# Altium PCB PCB1.PcbDoc
Units mm, origin at the board's own origin, x right, y up, seen from the top; angles counter-clockwise.
Board outline 191.39 x 165.1 mm, 2 copper layers (Top Layer, Bottom Layer); 71 components, 120 nets, 363 pads, 4 vias.
Unrouted connection lines stored in the file: 4.
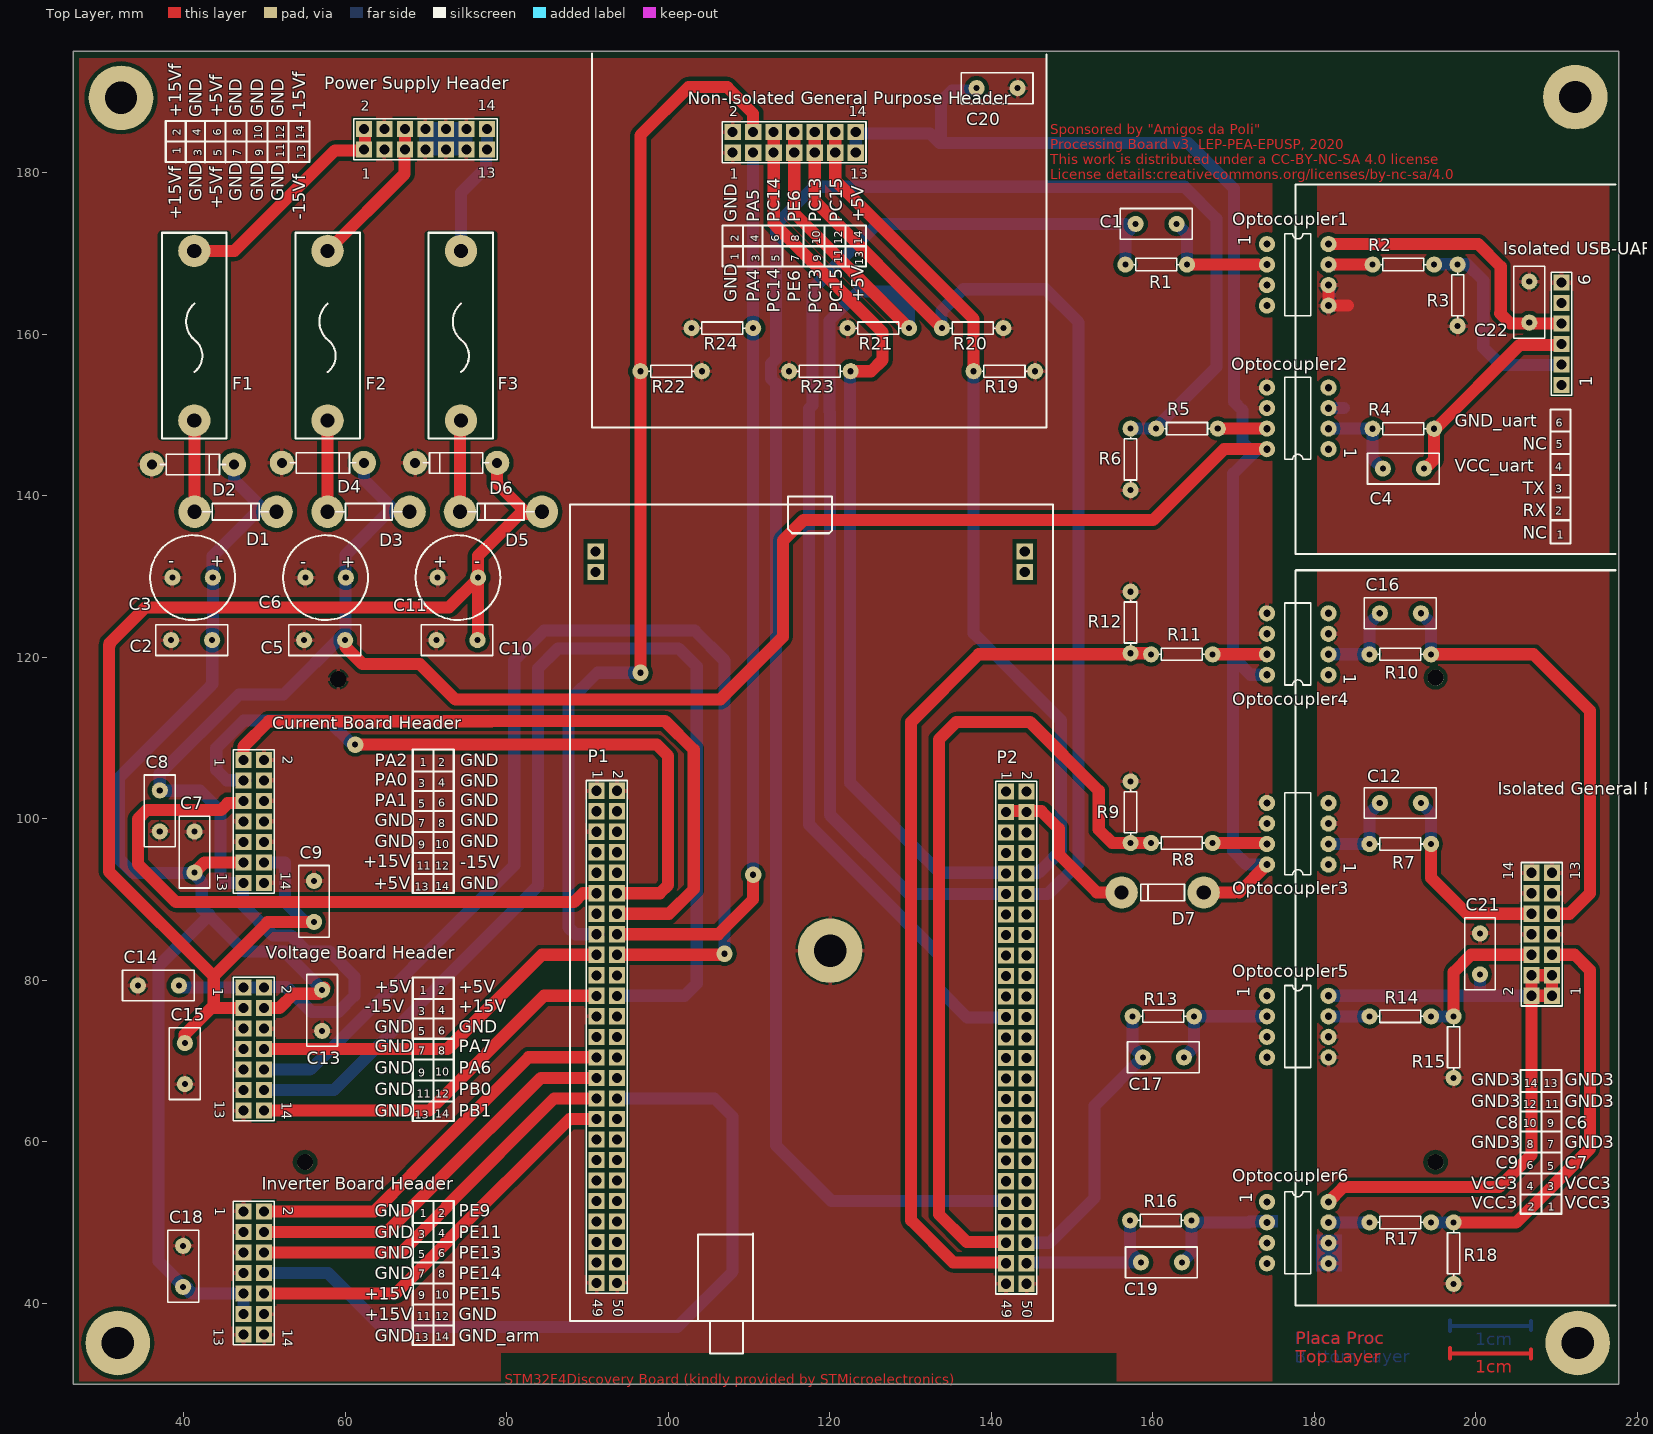
[diagram p0: Top Layer view]
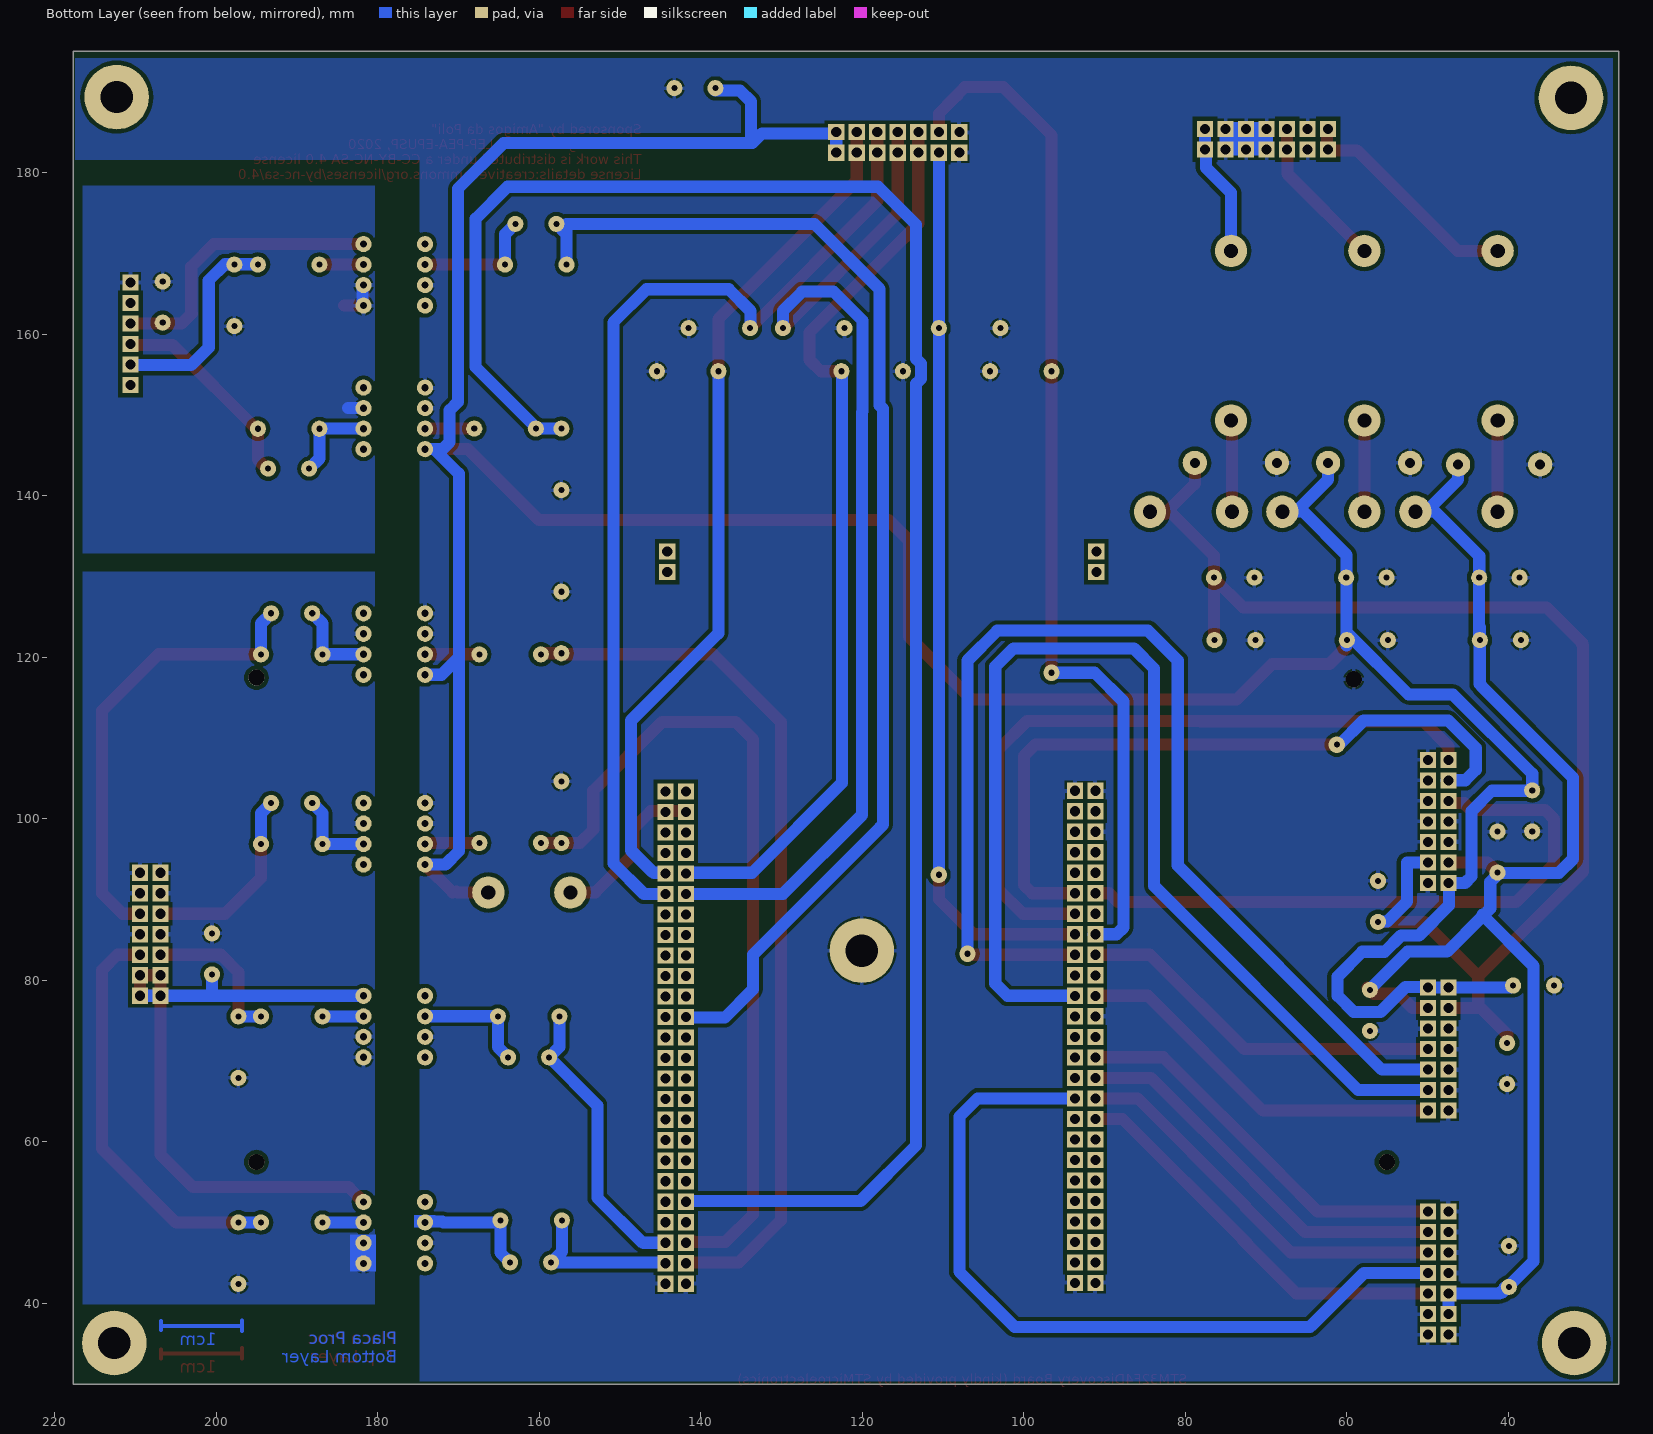
[diagram p1: Bottom Layer view, seen from below]

## Layer stack, top to bottom
Top Solder: solder mask 0.0102, Solder Resist, Dk 3.5
Top Layer: signal copper 0.0356
Dielectric 1: dielectric 0.32, FR-4, Dk 4.8
Bottom Layer: signal copper 0.0356
Bottom Solder: solder mask 0.0102, Solder Resist, Dk 3.5

## Board outline
26.289,195.072 26.289,29.972 217.678,29.972 217.678,195.072

## Design rules (kind name [scope] priority, off if disabled: settings)
Clearance Clearance_1 [All] p1: gap=0.5
PlaneConnect [All] p1: planeconnectstyle=Direct reliefexpansion=0.508 reliefentries=4 reliefconductorwidth=0.254 reliefairgap=0.508
PolygonConnect [All] p1: connectstyle=Relief reliefconductorwidth=0.5 reliefentries=4 polygonreliefangle="90 Angle" airgapwidth=0.254
RoomDefinition "S bus (5.775 X 3.30 inches)" [InComponentClass('S bus (5.775 X 3.30 inches)')] p1: confinementstyle=ConfineOut formatcopy=TRUE lockcomponents=FALSE outline 358.775,194.945 298.45,194.945 298.45,25.4 358.775,25.4
RoutingVias [All] p1: holewidth=0.711 width=1.27 viastyle="Through Hole" minholewidth=0.711 minwidth=1.27 maxholewidth=0.711 maxwidth=1.27
SolderMaskExpansion [All] p1: expansion=0.102
Width [All] p1: maxlimit=1.5 minlimit=1 preferedwidth=1.5 minimp=50.000000 maximp=50.000000 favimp=50.000000 checkconnectedcopper=TRUE
29 further rules are at their usual default settings.

## Components (designator, comment, footprint, x,y, rotation, side; value= is the part's Value field where it differs from the comment)
C1 "Ceramic 50 V" RAD-0.2 160.4,173.7 r180 top
C2 "Ceramic 50 V" RAD-0.2 40.953,122.143 r0 top
C3 "Electrolytic 50 V" RB5-10.5 41.063,129.89 r0 top
C4 "Ceramic 50 V" RAD-0.2 191.008,143.383 r0 top
C5 "Ceramic 50 V" RAD-0.2 57.425,122.143 r0 top
C6 "Electrolytic 50 V" RB5-10.5 57.535,129.89 r0 top
C7 "Ceramic 50 V" RAD-0.2 41.3,95.9 r270 top
C8 "Ceramic 50 V" RAD-0.2 37,101 r90 top
C9 "Ceramic 50 V" RAD-0.2 56.1,89.8 r270 top
C10 "Ceramic 50 V" RAD-0.2 73.808,122.143 r0 top
C11 "Electrolytic 50 V" RB5-10.5 73.918,129.89 r0 top
C12 "Ceramic 50 V" RAD-0.2 190.627,101.981 r0 top
C13 "Ceramic 50 V" RAD-0.2 57.1,76.3 r90 top
C14 "Ceramic 50 V" RAD-0.2 36.83,79.375 r0 top
C15 "Ceramic 50 V" RAD-0.2 40.1,69.7 r90 top
C16 "Ceramic 50 V" RAD-0.2 190.627,125.476 r0 top
C17 "Ceramic 50 V" RAD-0.2 161.29,70.485 r180 top
C18 "Ceramic 50 V" RAD-0.2 39.9,44.6 r90 top
C19 "Ceramic 50 V" RAD-0.2 161.036,45.085 r180 top
C20 "Ceramic 50 V" RAD-0.2 140.7,190.5 r0 top
C21 "Ceramic 50 V" RAD-0.2 200.5,83.3 r270 top
C22 "Ceramic 50 V" RAD-0.2 206.6,164 r270 top
"Current Board Header" "Header 7X2" HDR2X7 47.371,107.315 r270 top (schematic designator "CURRENT TRANS.")
D1 "1N5822" AXIAL-0.4 46.393,138.048 r0 top
D2 "1N4745A" DIODE-0.4 41.1,143.9 r0 top
D3 "1N5822" AXIAL-0.4 62.865,138.048 r0 top
D4 "1N4735A" DIODE-0.4 57.2,144.1 r0 top
D5 "1N5822" AXIAL-0.4 79.248,138.048 r180 top
D6 "1N4745A" DIODE-0.4 73.7,144.1 r180 top
D7 "1N5822" AXIAL-0.4 161.2,90.9 r180 top
F1 "1.0 A" Fusivel 41.275,147.352 r90 top
F2 "2.0 A" Fusivel 57.785,147.352 r90 top
F3 "1.0 A" Fusivel 74.295,147.352 r90 top
"Inverter Board Header" "Header 7X2" HDR2X7 47.371,51.392 r270 top (schematic designator INVERTER)
"Isolated General Purpose Header" "Header 7X2" HDR2X7 209.423,78.105 r90 top (schematic designator ISOLATED)
"Isolated USB-UART Header" "Header 6H" HDR1X6 210.593,153.736 r90 top (schematic designator UART)
"Non-Isolated General Purpose Header" "Header 7X2" HDR2X7 107.95,182.515 r0 top (schematic designator "NOT ISOLATED")
Optocoupler1 "A2200" DIP8 174.117,171.196 r0 top
Optocoupler2 "A2200" DIP8 181.737,145.796 r180 top
Optocoupler3 "A2200" DIP8 181.737,94.361 r180 top
Optocoupler4 "A2200" DIP8 181.737,117.856 r180 top
Optocoupler5 "A2200" DIP8 174.117,78.105 r0 top
Optocoupler6 "A2200" DIP8 174.117,52.578 r0 top
P1 "Header 25X2" HDR2X25 91.1,103.5 r270 top
P2 "Header 25X2" HDR2X25 141.8,103.4 r270 top
"Power Supply Header" "Header 7X2" HDR2X7 62.275,182.915 r0 top (schematic designator "POWER SUPPLY")
R1 "1/4W*" AXIAL-0.3 160.401,168.656 r0 top
R2 "1/4W*" AXIAL-0.3 191.008,168.656 r0 top
R3 "1/4W*" AXIAL-0.3 197.739,164.846 r90 top
R4 "1/4W*" AXIAL-0.3 191.008,148.326 r180 top
R5 "1/4W*" AXIAL-0.3 164.211,148.336 r180 top
R6 "1/4W*" AXIAL-0.3 157.226,144.526 r90 top
R7 "1/4W*" AXIAL-0.3 190.627,96.901 r180 top
R8 "1/4W*" AXIAL-0.3 163.576,97.028 r180 top
R9 "1/4W*" AXIAL-0.3 157.226,100.838 r270 top
R10 "1/4W*" AXIAL-0.3 190.627,120.396 r180 top
R11 "1/4W*" AXIAL-0.3 163.576,120.396 r180 top
R12 "1/4W*" AXIAL-0.3 157.226,124.333 r270 top
R13 "1/4W*" AXIAL-0.3 161.29,75.565 r0 top
R14 "1/4W*" AXIAL-0.3 190.627,75.555 r0 top
R15 "1/4W*" AXIAL-0.3 197.231,71.745 r90 top
R16 "1/4W*" AXIAL-0.3 160.976,50.292 r0 top
R17 "1/4W*" AXIAL-0.3 190.627,50.038 r0 top
R18 "1/4W*" AXIAL-0.3 197.231,46.228 r90 top
R19 "1/4W*" AXIAL-0.3 141.605,155.448 r0 top
R20 "1/4W*" AXIAL-0.3 137.668,160.782 r0 top
R21 "1/4W*" AXIAL-0.3 125.984,160.782 r180 top
R22 "1/4W*" AXIAL-0.3 100.33,155.448 r0 top
R23 "1/4W*" AXIAL-0.3 118.745,155.448 r180 top
R24 "1/4W*" AXIAL-0.3 106.68,160.782 r180 top
"Voltage Board Header" "Header 7X2" HDR2X7 47.371,79.121 r270 top (schematic designator "VOLTAGE TRANS.")

## Footprints (in the part's own frame and the unit in brackets; to place one, negate y for a bottom-side part, rotate by r counter-clockwise, add the part's x,y. Pads: shape width x height; smd on the part's side, far side on the other; paste and mask are expansions set on the pad)
AXIAL-0.3 [mm] "Axial Device, Thru-Hole; 2 Leads; 0.3 in Pin Spacing"
  round 2 hole 0.75: 1(-3.81,0) 2(3.81,0)
  silkscreen extent -2.77,-0.76 2.77,0.76
AXIAL-0.4 [mm] "Axial Device, Thru-Hole; 2 Leads; 0.4 in Pin Spacing"
  round 4 hole 1.75: 1(-5.08,0) 2(5.08,0)
  silkscreen extent -4.06,-1.02 4.06,1.02
DIODE-0.4 [mm] "Diode, Thru-Hole; 2 Leads; 0.4 in Pin Spacing"
  round 3 hole 1.25: 1(-5.08,0) 2(5.08,0)
  silkscreen extent -4.06,-1.27 4.06,1.27
DIP8 [mm]
  round 2 hole 0.9: 1(0,0) 2(0,-2.54) 3(0,-5.08) 4(0,-7.62) 5(7.62,0) 6(7.62,-2.54) 7(7.62,-5.08) 8(7.62,-7.62)
  silkscreen extent 2.21,-8.89 5.41,1.27
Fusivel [mm]
  round 4 hole 1.75 unplated: 1(2,0) 2(23,0)
  silkscreen extent -0.25,-4 25.25,4, body extent 0,-4 25,4, height 20
HDR1X6 [mm]
  rect 2x2 hole 1.25: 1(0,0) 2(2.54,0) 3(5.08,0) 4(7.62,0) 5(10.16,0) 6(12.7,0)
  silkscreen extent -1.27,-1.27 13.97,1.27, body extent -1.02,-1.02 13.72,1.02, height 5.08
HDR2X7 [mm] "Connector; Header; 7x2 Position"
  rect 2x2 hole 1.25: 1(0,0) 2(0,2.54) 3(2.54,0) 4(2.54,2.54) 5(5.08,0) 6(5.08,2.54) 7(7.62,0) 8(7.62,2.54) 9(10.16,0) 10(10.16,2.54) 11(12.7,0) 12(12.7,2.54) 13(15.24,0) 14(15.24,2.54)
  silkscreen extent -1.27,-1.27 16.51,3.81
HDR2X25 [mm] "Connector; Header; 25x2 Position"
  rect 2x2 hole 1.25: 1(0,0) 2(0,2.54) 3(2.54,0) 4(2.54,2.54) 5(5.08,0) 6(5.08,2.54) 7(7.62,0) 8(7.62,2.54) 9(10.16,0) 10(10.16,2.54) 11(12.7,0) 12(12.7,2.54) 13(15.24,0) 14(15.24,2.54) 15(17.78,0) 16(17.78,2.54) 17(20.32,0) 18(20.32,2.54) 19(22.86,0) 20(22.86,2.54) 21(25.4,0) 22(25.4,2.54) 23(27.94,0) 24(27.94,2.54) 25(30.48,0) 26(30.48,2.54) 27(33.02,0) 28(33.02,2.54) 29(35.56,0) 30(35.56,2.54) 31(38.1,0) 32(38.1,2.54) 33(40.64,0) 34(40.64,2.54) 35(43.18,0) 36(43.18,2.54) 37(45.72,0) 38(45.72,2.54) 39(48.26,0) 40(48.26,2.54) 41(50.8,0) 42(50.8,2.54) 43(53.34,0) 44(53.34,2.54) 45(55.88,0) 46(55.88,2.54) 47(58.42,0) 48(58.42,2.54) 49(60.96,0) 50(60.96,2.54)
  silkscreen extent -1.27,-1.27 62.23,3.81
RAD-0.2 [mm] "Radial Cap, Thru-Hole; 2 Leads; 0.2 in Pin Spacing"
  round 2 hole 0.75 unplated: 1(-2.54,0) 2(2.54,0)
  silkscreen extent -4.44,-1.91 4.44,1.91
RB5-10.5 [mm] "Capacitor (Radial); 2 Leads"
  round 2 hole 0.75: 1(-2.5,0) 2(2.5,0)
  silkscreen extent -5.25,-5.25 5.25,5.25

## Part data
C1 C2 C3 C4 C5 C6 C7 C8 C9 C10 C11 C12 C13 C14 C15 C16 C17 C18 C19 C20 C21 C22: library part Cap, "Capacitor"
"Current Board Header" "Inverter Board Header" "Isolated General Purpose Header" "Non-Isolated General Purpose Header" "Power Supply Header" "Voltage Board Header": "Header, 7-Pin, Dual row"
D1 D3 D5 D7: library part Diode, "Default Diode"
D2 D4 D6: library part "D Zener", "Zener Diode"
F1 F2 F3: library part "Fuse 2", "Fuse"
"Isolated USB-UART Header": "Header, 6-Pin, Right Angle"
Optocoupler1 Optocoupler2 Optocoupler3 Optocoupler4 Optocoupler5 Optocoupler6: library part Optoacoplador
P1 P2: "Header, 25-Pin, Dual row"
R1 R2 R3 R4 R5 R6 R7 R8 R9 R10 R11 R12 R13 R14 R15 R16 R17 R18 R19 R20 R21 R22 R23 R24: library part Res1, "Resistor"

## Free pads (board coordinates)
  round 8 hole 4: 10(31.8,35.1) 10(32.2,189.3) 10(120.015,83.693) 10(212.3,189.4) 10(212.6,35.1)
  rect 2x2 hole 1.25: 11(90.983,130.583) 11(90.983,133.123) 11(144.121,130.583) 11(144.121,133.123)
  round 2 hole 2 paste+2: 12(59.1,117.3) 13(55,57.5) 14(195,57.5) 15(195,117.5)

## Via types
v1: diameter 2, hole 0.75, Top Layer to Bottom Layer, 4 vias

## Nets (pads, with @x,y where several pads share a name; then routed paths per layer and width w, separated by ;. In a path a pad name is that pad's centre, name@x,y a point inside that pad or via, vN(x,y) a via of type N, cw(c..) or ccw(c..) an arc to the next point about the centre after c; other vN are vias at no path point)
"+3 V ARM": P2.6
"+ 3 V ARM": P2.5
"+ 5 V": "Current Board Header.13" "Non-Isolated General Purpose Header.13" "Non-Isolated General Purpose Header.14" "Voltage Board Header.1" "Voltage Board Header.2" C5.2 C6.2 C8.2 C14.2 C20.1 D3.2 D4.2 D7.1 Optocoupler2.5 Optocoupler3.5 Optocoupler4.5 | length 432.7
  Top Layer w1.5: C5.2@60,122.2 60,121.3 62.1,119.2 69.2,119.2 ; 69.204,119.204 73.6,114.808 106.426,114.808 114.173,122.555 114.173,134.493 116.713,137.033 160.02,137.033 168.783,145.796 Optocoupler2.5 Optocoupler2.5@174.244,145.796 ; D7.1 170.1,90.9 170.2,91 ; 170.688,90.932 Optocoupler3.5
  Bottom Layer w1.5: C14.2 39.624,79.121 47.371,79.121 49.911,79.121 49.911,79.2 52.7,79.2 55.8,76.1 59.1,76.1 61.1,78.1 61.1,80.5 58.05,83.55 55.278,83.55 53.262,85.566 51.034,85.566 47.3,89.3 47.3,92.075 ; 47.371,92.075 47.3,92.075 ; C5.2@60,121.5 60,132.7 65.4,138.1 D3.2@68,138.1 ; C5.2@60,123.1 52.3,115.4 46.8,115.4 37,105.6 37,103.5 42,103.5 44.5,101 44.5,92.9 45.325,92.075 47.3,92.075 ; D4.2 62.28,142.02 D3.2@66.1,138.2 ; 123,185.2 123.19,185.01 ; 123.19,182.515 123.19,185.01 ; 123.38,184.9 132.4,184.9 133.6,183.7 164.4,183.7 170.053,178.047 170.053,151.638 171.069,150.622 171.069,146.685 171.958,145.796 172.974,145.796 ; 123.38,185.2 123.19,185.01 ; 133.8,184.2 133.75,184.25 133.75,188.85 135.1,190.2 C20.1@138.2,190.2 ; Optocoupler3.5 171.577,94.361 169.926,96.012 169.926,120.015 ; Optocoupler4.5 172.085,117.856 169.926,120.015 ; Optocoupler2.5 172.974,145.796 ; 169.926,120.015 169.926,142.748 172.974,145.796
"+ 5 V ARM": D7.2 P2.3 P2.4 | length 19.3
  Top Layer w1.5: P2.3@142.621,100.965 146.177,100.965 148.336,98.806 148.336,95.631 153.035,90.932 ; 153.2,90.9 D7.2
"+ 5 Vf": "Power Supply Header.5" "Power Supply Header.6" F2.2 | length 18.8
  Top Layer w1.5: F2.2 67.3,179.867 67.3,182.5 67.4,182.6 ; 67.355,182.915 67.355,185.455
"+ 15 V": "Current Board Header.11" "Inverter Board Header.9" "Inverter Board Header.11" "Voltage Board Header.4" C2.2 C3.2 C7.2 C13.2 C18.1 D1.2 D2.2 | length 171.9
  Top Layer w1.5: C7.2 42.54,94.6 47.5,94.6 ; 49.911,76.581 51.816,76.581 53.594,78.359 56.659,78.359 C13.2@57.4,79.1
  Bottom Layer w1.5: C18.1@40.4,42 40.4,41.9 41.068,41.232 47.371,41.232 47.371,38.692 ; 40.671,41.371 36.83,45.212 36.83,81.788 43.18,88.138 43.18,87.92 47.534,83.566 52.434,83.566 C13.2@57.25,78.75 ; 43.1,88 43.071,88.029 42.2,88.9 42.2,92.2 41.1,93.3 33.7,93.3 31.951,95.049 31.951,105.1 43.2,116.349 43.2,116.414 43.493,116.707 43.493,123.743 ; C3.2 43.563,132.563 43.6,132.6 49.1,138.1 D1.2@51.6,138.1 ; C2.2@43.6,122.1 C3.2@43.6,129.9 ; D2.2 46.18,142.02 D1.2@50.1,138.1
"+ 15 Vf": "Power Supply Header.1" "Power Supply Header.2" F1.2 | length 29.3
  Top Layer w1.5: F1.2@41.275,169.971 F1.2 46.252,170.352 58.7,182.8 62.4,182.8 62.4,185.4
"- 15 V": "Current Board Header.12" "Voltage Board Header.3" C9.2 C10.2 C11.2 C15.2 D5.1 D6.1 | length 164.8
  Top Layer w1.5: 30.8,121.6 30.725,121.525 30.725,93.481 43.688,80.518 ; 30.8,121.8 35.2,126.2 72.8,126.2 C11.2@76.3,129.7 ; C15.2 40.1,73.3 43.688,76.888 ; 43.7,76.9 43.688,76.888 ; 47.371,76.581 43.688,76.581 43.688,76.888 ; 50.3,87.2 50.36,87.26 C9.2 ; 50.37,87.2 43.688,80.518 ; C10.2@76.4,122 76.4,132.3 ; 76.4,132.6 81.848,138.048 82.252,138.048 ; D6.1 78.78,141.52 82.252,138.048 ; D5.1@82.5,137.8 82.252,138.048 ; D5.1 82.252,138.048 ; 43.688,76.888 43.688,80.518
  Bottom Layer w1.5: 49.911,94.615 52.5,94.615 52.5,89.76 54.96,87.3 C9.2@56.2,87.3
"- 15 Vf": "Power Supply Header.13" "Power Supply Header.14" F3.2 | length 16.2
  Bottom Layer w1.5: F3.2@74.295,170.434 74.295,177.546 77.4,180.651 77.4,182.8 ; 77.515,182.915 77.515,185.455
BOOT0: P2.21
C6: "Isolated General Purpose Header.9" C16.2 R10.1 | length 56.5
  Top Layer w1.5: R10.1 207.137,120.396 214.122,113.411 214.122,90.805 211.582,88.265 209.423,88.265
  Bottom Layer w1.5: C16.2 194.437,124.206 R10.1
C7: "Isolated General Purpose Header.5" R17.2 R18.2 | length 51.1
  Top Layer w1.5: R18.2 204.978,50.038 214.122,59.182 214.122,81.28 212.217,83.185 209.423,83.185
  Bottom Layer w1.5: R17.2 R18.2
C8: "Isolated General Purpose Header.10" C12.2 R7.1 | length 24.1
  Top Layer w1.5: R7.1 194.437,92.71 198.882,88.265 206.883,88.265
  Bottom Layer w1.5: C12.2 194.437,100.711 R7.1
C9: "Isolated General Purpose Header.6" R14.2 R15.2 | length 18.8
  Top Layer w1.5: R15.2 197.231,81.026 199.39,83.185 206.883,83.185
  Bottom Layer w1.5: R14.2 R15.2
GND: "Current Board Header.2" "Current Board Header.4" "Current Board Header.6" "Current Board Header.7" "Current Board Header.8" "Current Board Header.9" "Current Board Header.10" "Current Board Header.14" "Inverter Board Header.1" "Inverter Board Header.3" "Inverter Board Header.5" "Inverter Board Header.7" "Inverter Board Header.12" "Inverter Board Header.13" "Inverter Board Header.14" "Non-Isolated General Purpose Header.1" "Non-Isolated General Purpose Header.2" "Power Supply Header.3" "Power Supply Header.4" "Power Supply Header.7" "Power Supply Header.8" "Power Supply Header.9" "Power Supply Header.10" "Power Supply Header.11" "Power Supply Header.12" "Voltage Board Header.5" "Voltage Board Header.6" "Voltage Board Header.7" "Voltage Board Header.9" "Voltage Board Header.11" "Voltage Board Header.13" C2.1 C3.1 C5.1 C6.1 C7.1 C8.1 C9.1 C10.1 C11.1 C13.1 C14.1 C15.1 C18.2 C20.2 D2.1 D4.1 D6.2 Optocoupler1.3 Optocoupler2.7 Optocoupler2.8 Optocoupler3.7 Optocoupler3.8 Optocoupler4.7 Optocoupler4.8 Optocoupler5.3 Optocoupler6.3 P1.1 P1.2 P1.5 P1.23 P1.49 P1.50 P2.49 P2.50 pad.10@120.015,83.693 pad.12 R6.1 R9.1 R12.1 R19.2 R20.2 R21.2 R22.2 R23.2 R24.2
"GND ARM": P2.1 P2.2
"GND uart": "Isolated USB-UART Header.6" C22.1 Optocoupler1.7 Optocoupler1.8 Optocoupler2.3 R3.1 | length 9.3
  Top Layer w1.5: Optocoupler1.7@181.61,166.116 181.737,165.989 Optocoupler1.8 184.15,163.576
  Bottom Layer w1.5: Optocoupler2.3@181.864,150.876 183.642,150.876 ; Optocoupler1.8@181.864,163.576 Optocoupler1.7@181.864,166.116
GND_3: "Isolated General Purpose Header.7" "Isolated General Purpose Header.8" "Isolated General Purpose Header.11" "Isolated General Purpose Header.12" "Isolated General Purpose Header.13" "Isolated General Purpose Header.14" C21.1 Optocoupler3.3 Optocoupler4.3 Optocoupler5.7 Optocoupler5.8 Optocoupler6.7 Optocoupler6.8 R15.1 R18.1
NC: P1.48
NetC1_1: C1.1 Optocoupler1.2 R1.2 | length 14.1
  Top Layer w1.5: R1.2 172.974,168.656
  Bottom Layer w1.5: C1.1 164.2,172.44 164.2,171.1 ; R1.2 164.211,170.889
NetC4_1: C4.1 Optocoupler2.2 R4.2 | length 10.8
  Bottom Layer w1.5: Optocoupler2.2@181.864,148.336 187.188,148.336 R4.2 187.198,144.653 C4.1
NetC12_1: C12.1 Optocoupler3.2 R7.2 | length 10.7
  Bottom Layer w1.5: Optocoupler3.2 R7.2 186.817,100.711 C12.1
NetC16_1: C16.1 Optocoupler4.2 R10.2 | length 10.7
  Bottom Layer w1.5: Optocoupler4.2 R10.2 186.817,124.206 C16.1
NetC17_1: C17.1 Optocoupler5.2 R13.2 | length 14.8
  Top Layer w0: Optocoupler5.2@173.99,75.692 Optocoupler5.2
  Bottom Layer w1.5: C17.1 165.1,71.755 R13.2 Optocoupler5.2
NetC19_1: C19.1 Optocoupler6.2 R16.2 | length 15.2
  Bottom Layer w1.5: C19.1 164.786,46.295 R16.2 165.04,50.038 171.86,50.038 171.987,50.165 173.99,50.165 Optocoupler6.2
NetD1_1: D1.1 F1.1 | length 10.4
  Top Layer w1: F1.1@41.313,149.136 F1.1@41.402,149.225
  Top Layer w1.5: D1.1@41.3,137.9 41.313,137.913 D1.1 ; D1.1@41.3,139.5 41.313,143.742 F1.1@41.313,149.6
NetD3_1: D3.1 F2.1 | length 10
  Top Layer w1.5: D3.1 57.785,137.915 D3.1@57.8,137.9 ; D3.1@57.785,139.5 57.785,143.742 F2.1
NetD5_2: D5.2 F3.1 | length 9.7
  Top Layer w1.5: D5.2@74.168,139.6 74.168,143.742 74.168,149.268 F3.1@74.2,149.3
NetOptocoupler1_6: Optocoupler1.6 R2.1 | length 5.3
  Top Layer w1.5: Optocoupler1.6@181.864,168.656 R2.1
NetOptocoupler2_6: Optocoupler2.6 R5.1 | length 6.2
  Top Layer w1.5: R5.1 Optocoupler2.6 Optocoupler2.6@174.244,148.336
NetOptocoupler3_6: Optocoupler3.6 R8.1 | length 6.8
  Top Layer w1.5: R8.1 173.99,97.028 Optocoupler3.6
NetOptocoupler4_6: Optocoupler4.6 R11.1 | length 6.7
  Top Layer w1.5: R11.1 Optocoupler4.6
NetOptocoupler5_6: Optocoupler5.6 R14.1 | length 5.1
  Bottom Layer w1.5: Optocoupler5.6 181.747,75.555 R14.1 R14.1@186.807,75.565
NetOptocoupler6_6: Optocoupler6.6 R17.1 | length 5.1
  Bottom Layer w1.5: Optocoupler6.6 R17.1
NRST: P1.6
PA0: "Current Board Header.3" P1.12 | length 88.6
  Top Layer w1.5: v1@61,109.22 98.552,109.22 99.961,107.811 99.961,91.833 98.933,90.805 P1.12@94,90.805
  Bottom Layer w1.5: 47.6,104.8 45.3,104.8 44,106.1 44,108.8 47.4,112.2 57.9,112.2 60.9,109.2 v1(61.2,109.2)
PA1: "Current Board Header.5" P1.11 | length 78.7
  Top Layer w1.5: 45.4,101.9 44.6,101.1 35.4,101.1 34.3,100 34.3,94.4 39,89.7 88.3,89.7 89.4,90.8 P1.11 ; 45.4,102 47.4,102
PA2: "Current Board Header.1" P1.14 | length 88
  Top Layer w1.5: 47.371,107.315 47.371,108.971 50.5,112.1 77.81,112.1 ; 78.1,112.1 77.81,112.1 ; P1.14@94.1,88.265 100.076,88.265 103.124,91.313 103.124,108.585 99.568,112.141 77.851,112.141 77.81,112.1
PA3: P1.13
PA4: "Non-Isolated General Purpose Header.3" P1.16 R24.1 | length 110.7
  Top Layer w1.5: P1.16@93.9,85.725 106.172,85.725 110.49,90.043 v1(110.49,93.091)
  Bottom Layer w1.5: v1(110.49,93.091) R24.1 110.49,182.4
PA5: "Non-Isolated General Purpose Header.4" P1.15 R22.1 | length 130.7
  Top Layer w1.5: v1(96.52,118.11) R22.1 96.52,184.658 102.489,190.627 107.273,190.627 109.4,188.5 ; 108.204,189.627 110.49,187.341 110.49,185.055
  Bottom Layer w1.5: P1.15@91.3,85.725 88.475,85.725 87.63,86.57 87.63,114.554 91.186,118.11 v1(96.52,118.11)
PA6: "Voltage Board Header.10" P1.18 | length 145.4
  Top Layer w1.5: P1.18@93.9,83.185 106.807,83.185 v1(106.934,83.312)
  Bottom Layer w1.5: 49.911,68.961 55.626,68.961 80.899,94.234 80.899,119.634 84.582,123.317 103.251,123.317 106.934,119.634 v1(106.934,83.312)
PA7: "Voltage Board Header.8" P1.17 | length 46.1
  Top Layer w1.5: 49.911,71.501 72.644,71.501 84.328,83.185 P1.17@91.2,83.185
PA8: P2.43
PA9: P2.44
PA10: P2.41 R5.2 R6.2 | length 235.6
  Bottom Layer w1.5: 118,178.3 113.3,173.6 113.3,156.995 112.685,156.38 112.685,154.516 113.3,153.901 113.3,59.6 120.2,52.7 P2.41@141.1,52.7 ; 118.1,178.3 163.9,178.3 167.853,174.347 167.853,155.953 R5.2@160.236,148.336 ; R6.2@157.2,148.3 157.236,148.336 R5.2@160.236,148.336 ; R5.2 R5.2@160.236,148.336
PA13: P2.42
PA14: P2.39
PA15: P2.40
PB0: "Voltage Board Header.12" P1.22 | length 142.2
  Bottom Layer w1.5: 49.911,66.421 58.547,66.421 83.82,91.694 83.82,118.618 86.319,121.117 101.26,121.117 103.505,118.872 103.505,79.629 101.981,78.105 P1.22@94.1,78.105
PB1: "Voltage Board Header.14" P1.21 | length 47.1
  Top Layer w1.5: 49.911,63.881 70.358,63.881 84.582,78.105 P1.21@91.1,78.105
PB2: P1.24
PB3: P2.28
PB4: P2.25
PB5: P2.26
PB6: C1.2 P2.23 R1.1 | length 152.3
  Bottom Layer w1.5: P2.23@141.9,75.4 137,75.4 133.5,78.9 133.5,83.189 117.824,98.865 117.824,98.876 117.4,99.3 117.4,150.8 117.824,151.224 117.824,165.624 125.9,173.7 156.6,173.7 156.6,172.44 ; R1.1@156.6,168.7 156.6,172.44 ; C1.2 156.6,172.44
PB7: P2.24
PB8: P2.19
PB9: P2.20
PB10: P1.34
PB11: P1.35
PB12: P1.36
PB13: P1.37
PB14: P1.38
PB15: P1.39
PC0: P1.8
PC1: P1.7
PC2: P1.10
PC3: P1.9
PC4: P1.20
PC5: P1.19
PC6: P2.47 R11.2 R12.2 | length 108.1
  Top Layer w1.5: P2.47@140.985,45.085 135.255,45.085 130.048,50.292 130.048,112.014 138.43,120.396 R12.2@157.226,120.396 ; R12.2 159.639,120.523 R11.2
PC7: C19.2 P2.48 R16.1 | length 19.9
  Bottom Layer w1.5: P2.48@144.4,45.085 C19.2 157.166,46.415 R16.1
PC8: P2.45 R8.2 R9.2 | length 104
  Top Layer w1.5: P2.45@141,47.7 140.9,47.6 136.931,47.6 133.477,51.054 133.477,109.855 135.636,112.014 144.78,112.014 153.289,103.505 153.289,98.679 154.94,97.028 R9.2 R8.2
PC9: C17.2 P2.46 R13.1 | length 35.9
  Bottom Layer w1.5: P2.46 147.08,47.52 ; 147.32,47.625 152.781,53.086 152.781,64.516 C17.2 157.48,71.755 R13.1
PC10: P2.37
PC11: P2.38
PC12: P2.35
PC13: "Non-Isolated General Purpose Header.9" "Non-Isolated General Purpose Header.10" P2.12 R20.1 | length 127.8
  Top Layer w1.5: 118.11,185.055 118.11,182.515 118.11,176.59 118.2,176.5 118.2,176.44 R20.1
  Bottom Layer w1.5: R20.1@133.8,160.7 133.8,162.9 136.5,165.6 146.7,165.6 150.8,161.5 150.8,94.5 147,90.7 P2.12
PC14: "Non-Isolated General Purpose Header.5" "Non-Isolated General Purpose Header.6" P2.9 R23.1 | length 113.1
  Top Layer w1.5: 113.03,185.055 113.03,182.515 113.03,173.736 113.57,173.196 113.57,173.178 114.742,172.006 114.76,172.006 126.492,160.274 126.492,156.845 125.095,155.448 R23.1
  Bottom Layer w1.5: R23.1 122.5,155.393 122.5,104.449 133.604,93.345 P2.9@141.7,93.345
PC15: "Non-Isolated General Purpose Header.11" "Non-Isolated General Purpose Header.12" P2.10 R19.1 | length 105.5
  Top Layer w1.5: 120.65,185.055 120.65,182.515 120.65,179.07 137.795,161.925 R19.1
  Bottom Layer w1.5: R19.1@137.795,155.321 137.795,123.005 148.6,112.2 148.6,96.1 145.941,93.441 ; P2.10@144.4,93.34 145.74,93.34
PD0: P2.36
PD1: P2.33
PD2: P2.34
PD3: P2.31
PD4: P2.32
PD5: P2.29
PD6: P2.30
PD7: P2.27
PD8: P1.40
PD9: P1.41
PD10: P1.42
PD11: P1.43
PD12: P1.44
PD13: P1.45
PD14: P1.46
PD15: P1.47
PE0: P2.17
PE1: P2.18
PE2: P2.15
PE3: P2.16
PE4: P2.13
PE5: P2.14
PE6: "Non-Isolated General Purpose Header.7" "Non-Isolated General Purpose Header.8" P2.11 R21.1 | length 131.7
  Top Layer w1.5: 115.57,185.055 115.57,182.515 115.57,175.006 R21.1
  Bottom Layer w1.5: R21.1@129.8,160.8 129.8,162.9 127.4,165.3 123.51,165.3 119.924,161.714 119.924,150.496 120,150.42 120,100.5 129.8,90.7 P2.11
PE7: P1.25
PE8: P1.26
PE9: "Inverter Board Header.2" P1.27 | length 48.9
  Top Layer w1.5: 49.911,51.392 63.592,51.392 68.2,56 ; 68.346,56.154 82.677,70.485 P1.27@91.1,70.485
PE10: P1.28
PE11: "Inverter Board Header.4" P1.29 | length 49.1
  Top Layer w1.5: 49.911,48.852 65.152,48.852 71.4,55.1 ; 71.378,55.122 84.201,67.945 P1.29@91.1,67.945
PE12: P1.30
PE13: "Inverter Board Header.6" P1.31 | length 49
  Top Layer w1.5: 49.911,46.312 66.912,46.312 72.5,51.9 ; 72.523,52.076 85.852,65.405 P1.31@91.1,65.405
PE14: "Inverter Board Header.8" P1.32 | length 97.6
  Bottom Layer w1.5: 49.911,43.772 57.828,43.772 64.4,37.2 ; 64.516,37.084 101.092,37.084 107.95,43.942 107.95,63.119 105.664,65.405 P1.32@94,65.405
PE15: "Inverter Board Header.10" P1.33 | length 50.9
  Top Layer w1.5: 49.911,41.232 66.232,41.232 72.8,47.8 ; 72.246,47.354 87.757,62.865 P1.33@91.1,62.865
PH0: P2.7
PH1: P2.8
RX: "Isolated USB-UART Header.2" R2.2 R3.2 | length 25.9
  Bottom Layer w1.5: R2.2@194.7,168.7 198.9,168.7 200.9,166.7 200.9,158.4 203.1,156.2 210.6,156.2
TX: "Isolated USB-UART Header.3" C4.2 R4.1 | length 25.9
  Top Layer w1.5: C4.2@193.5,143.2 194.818,144.518 R4.1 ; R4.1@194.9,148.2 205.4,158.7 210.6,158.7 210.7,158.6
VCC_3: "Isolated General Purpose Header.1" "Isolated General Purpose Header.2" "Isolated General Purpose Header.3" "Isolated General Purpose Header.4" C21.2 Optocoupler5.5 Optocoupler6.5 | length 87.8
  Top Layer w1.5: Optocoupler6.5 183.559,54.4 202.863,54.4 206.883,58.42 206.883,78.105 209.423,78.105 209.423,80.645 206.883,80.645 206.883,78.232 206.756,78.105
  Bottom Layer w1.5: Optocoupler5.5 200.5,78.105 ; C21.2 200.5,78.105 ; 209.423,78.105 206.883,78.105 200.5,78.105
VCC_uart: "Isolated USB-UART Header.4" C22.2 Optocoupler1.5 | length 36.3
  Top Layer w1.5: Optocoupler1.5@181.864,171.196 200.279,171.196 203.073,168.402 203.073,162.6 ; 202.973,162.626 204.243,161.356 206.91,161.356 210.593,161.356
VDD: P1.3 P1.4 P2.22
pads on no net: "Isolated USB-UART Header.1" "Isolated USB-UART Header.5" Optocoupler1.1 Optocoupler1.4 Optocoupler2.1 Optocoupler2.4 Optocoupler3.1 Optocoupler3.4 Optocoupler4.1 Optocoupler4.4 Optocoupler5.1 Optocoupler5.4 Optocoupler6.1 Optocoupler6.4
copper on no net: | length 24.8
  Top Layer w0.5: 196.8,33.2 196.8,34.5 ; 196.8,33.8 206.8,33.8 ; 206.8,33.2 206.8,34.3
  Bottom Layer w0.5: 196.8,36.6 196.8,37.9 ; 196.8,37.2 206.8,37.2 ; 206.8,36.7 206.8,37.8

## Polygon pours and split planes (outlines as drawn)
"GND uart" on Top Layer "GND_UART_L01_P008" (solid, remove dead copper, pour order 8): 180.34,178.435 216.535,178.435 216.535,132.8 180.34,132.8
GND on Top Layer "GND_L01_P018" (solid, remove dead copper, pour order 18): 27.051,194.183 27.051,30.353 174.752,30.353 174.752,37.846 174.752,38.862 174.752,181.61 217.424,181.61 217.424,194.183 150.622,194.183 90.17,194.183
GND_3 on Top Layer "GND_3_L01_P012" (solid, remove dead copper, pour order 12): 180.34,130.8 180.34,39.878 216.535,39.878 216.535,130.8
GND on Bottom Layer "GND_L02_P020" (solid, remove dead copper, pour order 20): 27.051,194.183 27.051,30.353 174.752,30.353 174.752,37.846 174.752,181.61 217.424,181.61 217.424,194.183 150.622,194.183 90.17,194.183
"GND uart" on Bottom Layer "GND_UART_L02_P010" (solid, remove dead copper, pour order 10): 180.34,178.435 216.535,178.435 216.535,132.9 180.34,132.9
GND_3 on Bottom Layer "GND_3_L02_P014" (solid, remove dead copper, pour order 14): 180.34,39.878 180.34,130.6 216.535,130.6 216.535,39.878

## Other copper
Top Layer:
  text "Sponsored by \"Amigos da Poli\" / Processing Board v3, LEP-PEA-EPUSP, 2020 / This work is distributed under a CC-BY-NC-SA 4.0 license / License details:creativecommons.org/licenses/by-nc-sa/4.0" at 147.3,179.2 h1.24
  text "Placa Proc / Top Layer" at 177.673,32.639 h1.52
  text "1cm" at 199.9,31.4 h1.52
  text "STM32F4Discovery Board (kindly provided by STMicroelectronics)" at 79.7,30 h1.24
Bottom Layer:
  rectangle net GND: 69.133,182.153 75.737,186.344
  rectangle net GND_3: 180.213,43.942 183.388,48.514
  rectangle net NetC19_1: 172.847,49.403 175.514,50.927
  text "1cm" at 199.9,34.8 h1.52
  text "Placa Proc / Bottom Layer" at 177.546,32.639 h1.52

## Silkscreen, mask and mechanical layers (free items; w line width, h text height)
Top Overlay:
  lines w0.254: 37.715,183.926 55.495,183.926 ; 40.215,181.326 40.215,186.406 ; 42.615,181.326 42.615,186.406 ; 45.115,181.326 45.115,186.406 ; 47.715,181.326 47.715,186.406 ; 48.3,137.1 48.3,139 ; 50.315,181.326 50.315,186.406 ; 52.915,181.326 52.915,186.406 ; 64.8,137.1 64.8,139 ; 68.326,37.285 73.406,37.285 ; 68.326,39.885 73.406,39.885 ; 68.326,42.485 73.406,42.485 ; 68.326,45.085 73.406,45.085 ; 68.326,47.585 73.406,47.585 ; 68.326,49.985 73.406,49.985 ; 68.326,64.985 73.406,64.985 ; 68.326,67.585 73.406,67.585 ; 68.326,70.185 73.406,70.185 ; 68.326,72.785 73.406,72.785 ; 68.326,75.285 73.406,75.285 ; 68.326,77.685 73.406,77.685 ; 68.326,93.185 73.406,93.185 ; 68.326,95.785 73.406,95.785 ; 68.326,98.385 73.406,98.385 ; 68.326,100.985 73.406,100.985 ; 68.326,103.485 73.406,103.485 ; 68.326,105.885 73.406,105.885 ; 70.926,34.905 70.926,52.685 ; 70.926,62.605 70.926,80.385 ; 70.926,90.805 70.926,108.585 ; 77.3,137.1 77.3,139 ; 90.551,194.818 90.551,192.405 90.551,148.463 146.8,148.463 146.8,194.7 ; 103.632,37.846 103.632,48.514 110.363,48.514 110.49,48.641 110.49,37.846 105.156,37.846 105.156,33.782 109.22,33.782 109.22,37.846 ; 106.7,170.926 124.295,170.926 ; 109.215,168.5 109.215,173.406 ; 111.615,168.5 111.615,173.406 ; 114.115,168.5 114.115,173.406 ; 116.715,168.5 116.715,173.406 ; 119.315,168.5 119.315,173.406 ; 121.915,168.5 121.915,173.406 ; 159.4,90 159.4,91.9 ; 177.673,132.836 217.297,132.836 ; 177.673,132.9 177.673,178.562 212.852,178.562 217.297,178.562 ; 205.526,53.485 210.606,53.485 ; 205.526,56.085 210.606,56.085 ; 205.526,58.685 210.606,58.685 ; 205.526,61.285 210.606,61.285 ; 205.526,63.785 210.606,63.785 ; 205.526,66.185 210.606,66.185 ; 208.126,51.105 208.126,68.885 ; 209.226,134.093 211.693,134.093 ; 209.226,134.1 209.226,150.693 211.693,150.693 ; 209.226,136.993 211.693,136.993 ; 209.226,139.793 211.693,139.793 ; 209.226,142.593 211.693,142.593 ; 209.3,145.185 211.706,145.185 ; 209.3,147.985 211.706,147.985 ; 211.726,134.1 211.726,150.685 ; 217.297,39.751 203.581,39.751 177.673,39.751 177.673,130.773 177.704,130.804 217.297,130.804 ; 37.738,181.345 55.518,181.345 55.518,186.425 37.738,186.425 37.738,181.345 ; 68.326,34.882 68.326,52.662 73.406,52.662 73.406,34.882 68.326,34.882 ; 68.326,62.611 68.326,80.391 73.406,80.391 73.406,62.611 68.326,62.611 ; 68.326,90.805 73.406,90.805 73.406,108.585 68.326,108.585 68.326,90.805 ; 87.8,37.846 87.8,138.938 147.6,138.938 147.6,37.846 87.8,37.846 ; 106.68,168.418 106.68,173.498 124.46,173.498 124.46,168.418 106.68,168.418 ; 114.808,135.89 114.808,139.954 120.269,139.954 120.269,135.763 119.888,135.382 117.602,135.382 115.316,135.382 114.808,135.89 ; 205.513,51.113 205.513,68.893 210.593,68.893 210.593,51.113 205.513,51.113
  text "+15Vf" at 39.643,186.933 h1.52 r90
  text "GND" at 42.183,186.933 h1.52 r90
  text "+5Vf" at 44.723,186.933 h1.52 r90
  text "GND" at 47.136,186.933 h1.52 r90
  text "GND" at 49.803,186.933 h1.52 r90
  text "GND" at 52.343,186.933 h1.52 r90
  text "-15Vf" at 55.01,186.933 h1.52 r90
  text "2" at 39.6,184.6 h1 r90
  text "4" at 42.1,184.6 h1 r90
  text "6" at 44.6,184.6 h1 r90
  text "8" at 47.1,184.6 h1 r90
  text "10" at 49.7,184.2 h1 r90
  text "12" at 52.4,184.2 h1 r90
  text "14" at 54.9,184.2 h1 r90
  text "1" at 39.6,182.3 h1 r90
  text "3" at 42.2,182.1 h1 r90
  text "5" at 44.7,182.1 h1 r90
  text "7" at 47.1,182.1 h1 r90
  text "9" at 49.8,182.1 h1 r90
  text "11" at 52.4,181.9 h1 r90
  text "13" at 55,181.7 h1 r90
  text "GND" at 42.183,176.518 h1.52 r90
  text "GND" at 47.136,176.518 h1.52 r90
  text "GND" at 49.803,176.518 h1.52 r90
  text "GND" at 52.343,176.518 h1.52 r90
  text "+5Vf" at 44.723,175.503 h1.52 r90
  text "+15Vf" at 39.643,174.233 h1.52 r90
  text "-15Vf" at 55.01,174.233 h1.52 r90
  text "GND" at 108.458,173.879 h1.52 r90
  text "PA5" at 111.252,173.879 h1.52 r90
  text "PC14" at 113.792,173.879 h1.52 r90
  text "PE6" at 116.332,173.879 h1.52 r90
  text "PC13" at 118.9,173.879 h1.52 r90
  text "PC15" at 121.539,173.879 h1.52 r90
  text "+5V" at 124.206,173.879 h1.52 r90
  text "2" at 108.7,171.5 h1 r90
  text "4" at 111.2,171.5 h1 r90
  text "6" at 113.7,171.5 h1 r90
  text "8" at 116.2,171.5 h1 r90
  text "10" at 118.8,171.1 h1 r90
  text "12" at 121.5,171.1 h1 r90
  text "14" at 124,171.1 h1 r90
  text "1" at 172.1,171 h1.52 r90
  text "1" at 108.7,169.2 h1 r90
  text "3" at 111.3,169 h1 r90
  text "5" at 113.8,169 h1 r90
  text "7" at 116.2,169 h1 r90
  text "9" at 118.9,169 h1 r90
  text "11" at 121.5,168.8 h1 r90
  text "13" at 124.1,168.6 h1 r90
  text "6" at 214.2,166.1 h1.52 r90
  text "GND" at 108.458,163.973 h1.52 r90
  text "PA4" at 111.252,163.973 h1.52 r90
  text "PE6" at 116.332,163.973 h1.52 r90
  text "+5V" at 124.206,163.973 h1.52 r90
  text "PC14" at 113.792,162.703 h1.52 r90
  text "PC15" at 121.539,162.703 h1.52 r90
  text "PC13" at 118.9,162.6 h1.52 r90
  text "1" at 214.4,153.5 h1.52 r90
  text "GND_uart" at 197.4,148.6 h1.52
  text "6" at 209.9,148.6 h1
  text "1" at 183.7,146 h1.52 r270
  text "5" at 209.9,145.9 h1
  text "NC" at 205.8,145.7 h1.52
  text "4" at 209.8,143.1 h1
  text "VCC_uart" at 197.4,143 h1.52
  text "3" at 209.8,140.4 h1
  text "TX" at 205.8,140.2 h1.52
  text "2" at 209.8,137.7 h1
  text "RX" at 205.8,137.5 h1.52
  text "NC" at 205.8,134.7 h1.52
  text "1" at 210,134.7 h1
  text "-" at 38.04,131.233 h1.52
  text "+" at 43.247,131.233 h1.52
  text "+" at 70.86,131.187 h1.52
  text "-" at 75.94,131.187 h1.52
  text "-" at 54.377,131.133 h1.52
  text "+" at 59.457,131.133 h1.52
  text "1" at 183.6,118 h1.52 r270
  text "PA2" at 63.6,106.5 h1.52
  text "1" at 69.2,106.5 h1
  text "2" at 71.5,106.5 h1
  text "GND" at 74.2,106.5 h1.52
  text "PA0" at 63.6,104.1 h1.52
  text "4" at 71.5,104 h1
  text "GND" at 74.2,104 h1.52
  text "3" at 69,103.9 h1
  text "PA1" at 63.6,101.6 h1.52
  text "GND" at 74.2,101.6 h1.52
  text "6" at 71.5,101.5 h1
  text "5" at 69,101.4 h1
  text "GND" at 63.6,99.1 h1.52
  text "GND" at 74.2,99.1 h1.52
  text "7" at 69,99 h1
  text "8" at 71.5,99 h1
  text "GND" at 63.627,96.52 h1.52
  text "GND" at 74.2,96.5 h1.52
  text "10" at 71.1,96.4 h1
  text "9" at 69,96.3 h1
  text "1" at 183.6,94.6 h1.52 r270
  text "+15V" at 62.2,94 h1.52
  text "-15V" at 74.2,93.9 h1.52
  text "11" at 68.8,93.7 h1
  text "12" at 71.1,93.7 h1
  text "+5V" at 63.5,91.3 h1.52
  text "GND" at 74.2,91.3 h1.52
  text "14" at 71.1,91.2 h1
  text "13" at 68.6,91.1 h1
  text "+5V" at 63.627,78.486 h1.52
  text "+5V" at 74.041,78.486 h1.52
  text "1" at 69.2,78.3 h1
  text "2" at 71.5,78.3 h1
  text "1" at 172,77.9 h1.52 r90
  text "-15V" at 62.357,76.073 h1.52
  text "+15V" at 74.041,76.073 h1.52
  text "4" at 71.5,75.8 h1
  text "3" at 69,75.7 h1
  text "GND" at 63.627,73.533 h1.52
  text "GND" at 74.041,73.533 h1.52
  text "6" at 71.5,73.3 h1
  text "5" at 69,73.2 h1
  text "GND" at 63.627,71.12 h1.52
  text "PA7" at 74.041,71.12 h1.52
  text "7" at 69,70.8 h1
  text "8" at 71.5,70.8 h1
  text "GND" at 63.627,68.453 h1.52
  text "PA6" at 74.041,68.453 h1.52
  text "10" at 71.1,68.2 h1
  text "9" at 69,68.1 h1
  text "GND3" at 199.417,66.988 h1.52
  text "GND3" at 210.974,66.988 h1.52
  text "14" at 205.9,66.8 h1
  text "13" at 208.4,66.8 h1
  text "GND" at 63.627,65.786 h1.52
  text "PB0" at 74.041,65.786 h1.52
  text "11" at 68.8,65.5 h1
  text "12" at 71.1,65.5 h1
  text "GND3" at 199.417,64.321 h1.52
  text "GND3" at 210.974,64.321 h1.52
  text "12" at 205.8,64.2 h1
  text "11" at 208.6,64.2 h1
  text "GND" at 63.627,63.119 h1.52
  text "PB1" at 74.041,63.119 h1.52
  text "14" at 71.1,63 h1
  text "13" at 68.6,62.9 h1
  text "10" at 205.8,61.8 h1
  text "9" at 208.8,61.8 h1
  text "C8" at 202.464,61.654 h1.52
  text "C6" at 210.974,61.654 h1.52
  text "GND3" at 199.417,59.241 h1.52
  text "GND3" at 210.974,59.241 h1.52
  text "8" at 206.3,59.2 h1
  text "7" at 208.8,59.2 h1
  text "C9" at 202.464,56.701 h1.52
  text "C7" at 210.974,56.701 h1.52
  text "6" at 206.3,56.6 h1
  text "5" at 208.8,56.5 h1
  text "VCC3" at 199.417,54.161 h1.52
  text "VCC3" at 210.974,54.161 h1.52
  text "4" at 206.3,54 h1
  text "3" at 208.8,54 h1
  text "1" at 172.3,52.4 h1.52 r90
  text "VCC3" at 199.417,51.748 h1.52
  text "VCC3" at 210.974,51.748 h1.52
  text "2" at 206.4,51.5 h1
  text "1" at 208.9,51.5 h1
  text "GND" at 63.627,50.757 h1.52
  text "PE9" at 74.041,50.757 h1.52
  text "1" at 69.2,50.7 h1
  text "2" at 71.5,50.7 h1
  text "4" at 71.5,48.2 h1
  text "3" at 69,48.1 h1
  text "GND" at 63.627,48.09 h1.52
  text "PE11" at 74.041,48.09 h1.52
  text "6" at 71.5,45.7 h1
  text "5" at 69,45.6 h1
  text "GND" at 63.627,45.55 h1.52
  text "PE13" at 74.041,45.55 h1.52
  text "7" at 69,43.2 h1
  text "8" at 71.5,43.2 h1
  text "GND" at 63.627,43.01 h1.52
  text "PE14" at 74.041,43.01 h1.52
  text "10" at 71.1,40.6 h1
  text "9" at 69,40.5 h1
  text "+15V" at 62.357,40.47 h1.52
  text "PE15" at 74.041,40.47 h1.52
  text "+15V" at 62.357,37.93 h1.52
  text "GND" at 74.041,37.93 h1.52
  text "11" at 68.8,37.9 h1
  text "12" at 71.1,37.9 h1
  text "14" at 71.1,35.4 h1
  text "13" at 68.6,35.3 h1
  text "GND" at 63.627,35.263 h1.52
  text "GND_arm" at 74.041,35.263 h1.52
Mechanical 1:
  lines w0.254: 26.924,30.226 217.424,30.226 217.424,194.818 26.924,194.818 26.924,187.706 26.924,30.226

## Text inside footprints (layer, text, board x,y; h text height)
"Current Board Header": Top Overlay "2" at 52.2,107.8 h1.27 r270; Top Overlay "1" at 43.8,107.5 h1.27 r270; Top Overlay "14" at 52,93.4 h1.27 r270; Top Overlay "13" at 44.1,93.3 h1.27 r270
"Inverter Board Header": Top Overlay "2" at 52.3,52 h1.27 r270; Top Overlay "1" at 43.9,51.9 h1.27 r270; Top Overlay "14" at 52.2,36.8 h1.27 r270; Top Overlay "13" at 43.7,36.9 h1.27 r270
"Isolated General Purpose Header": Top Overlay "2" at 204.6,78.1 h1.27 r90; Top Overlay "1" at 213,78.1 h1.27 r90; Top Overlay "14" at 204.6,92.5 h1.27 r90; Top Overlay "13" at 212.9,92.5 h1.27 r90
"Non-Isolated General Purpose Header": Top Overlay "2" at 107.5,187 h1.27; Top Overlay "1" at 107.6,179.3 h1.27; Top Overlay "14" at 122.3,187 h1.27; Top Overlay "13" at 122.5,179.3 h1.27
P1: Top Overlay "2" at 93.132,106.04 h1.27 r270; Top Overlay "1" at 90.592,106.04 h1.27 r270; Top Overlay "49" at 90.592,40.508 h1.27 r270; Top Overlay "50" at 93.132,40.508 h1.27 r270
P2: Top Overlay "2" at 143.832,105.94 h1.27 r270; Top Overlay "1" at 141.292,105.94 h1.27 r270; Top Overlay "49" at 141.292,40.408 h1.27 r270; Top Overlay "50" at 143.832,40.408 h1.27 r270
"Power Supply Header": Top Overlay "2" at 61.9,187.7 h1.27; Top Overlay "1" at 62,179.3 h1.27; Top Overlay "14" at 76.4,187.8 h1.27; Top Overlay "13" at 76.4,179.4 h1.27
"Voltage Board Header": Top Overlay "2" at 52.1,79.4 h1.27 r270; Top Overlay "1" at 43.6,79.1 h1.27 r270; Top Overlay "14" at 52.1,65 h1.27 r270; Top Overlay "13" at 43.8,65.1 h1.27 r270